# Altium PCB Thunderbolt3.pcbdoc (part 5 of 5)
Units mm, origin at the board's own origin, x right, y up, seen from the top; angles counter-clockwise.
Board outline 43.92 x 41.77 mm, 6 copper layers (TopLayer, MidLayer1, MidLayer2, MidLayer3, MidLayer4, BottomLayer); 211 components, 193 nets, 1132 pads, 744 vias.
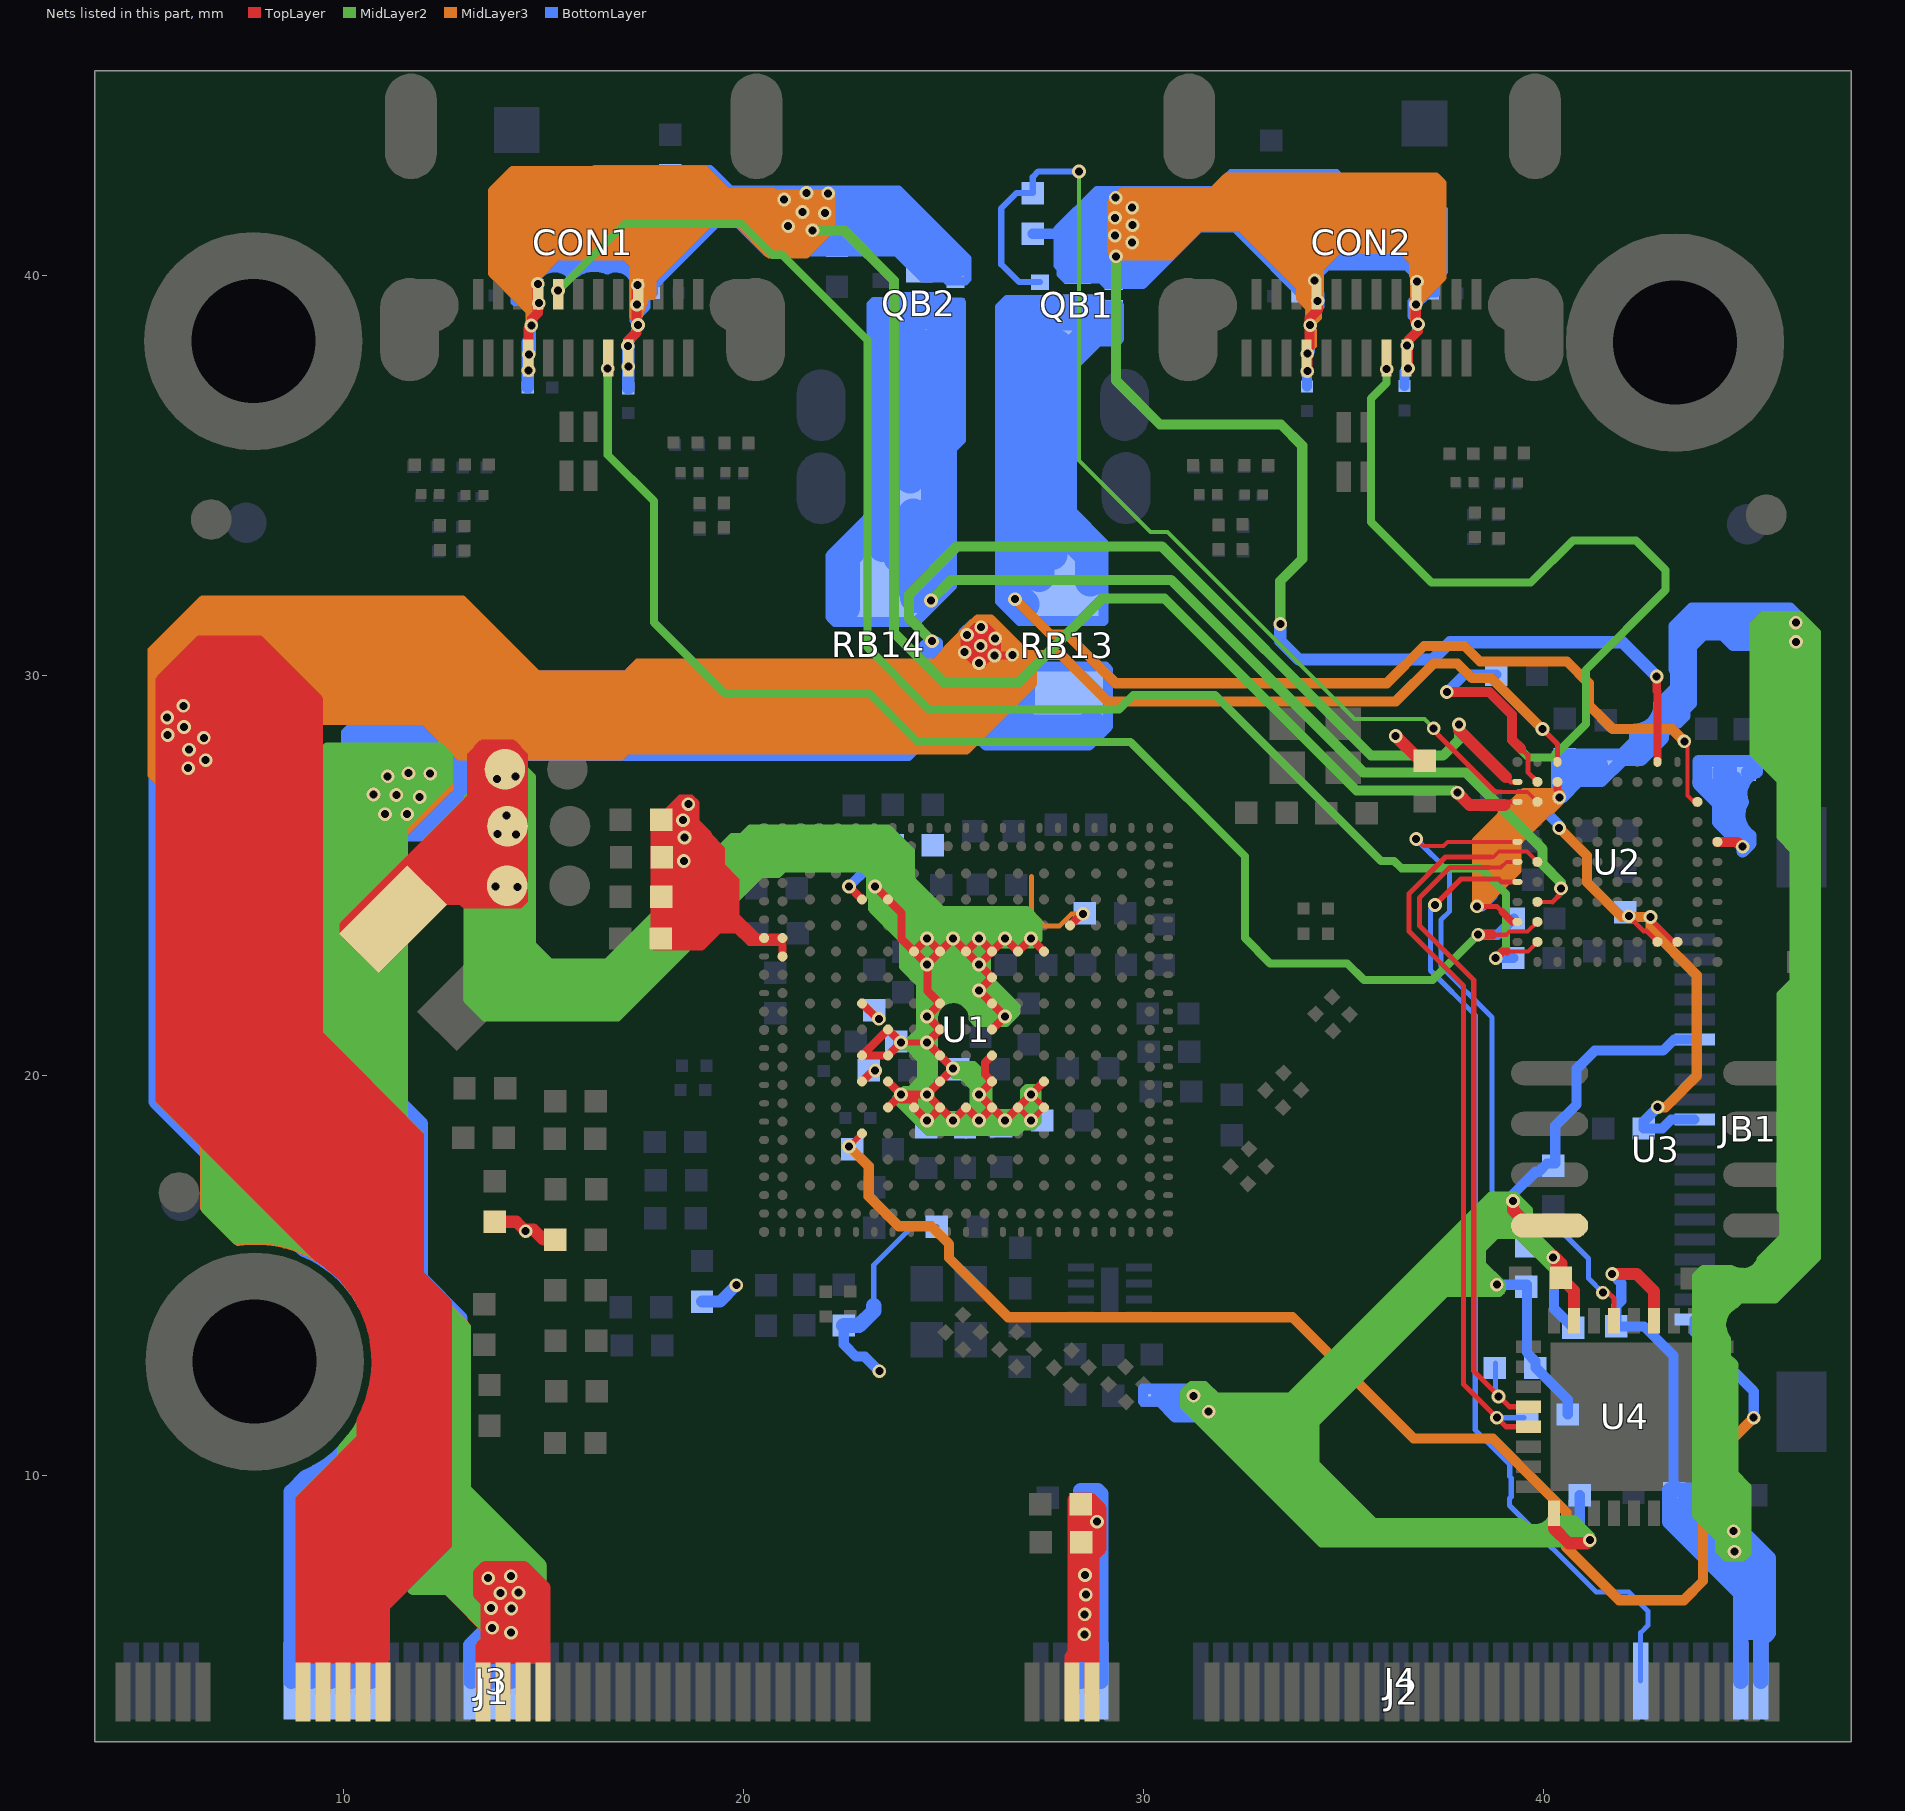
[diagram p9: the nets of this part, all layers, seen from the top]

## Via types
v1: diameter 0.343, hole 0.2, TopLayer to BottomLayer, tented both sides, 632 vias
v2: diameter 0.8, hole 0.8, TopLayer to BottomLayer, 112 vias

## Nets (pads, with @x,y where several pads share a name; then routed paths per layer and width w, separated by ;. In a path a pad name is that pad's centre, name@x,y a point inside that pad or via, vN(x,y) a via of type N, cw(c..) or ccw(c..) an arc to the next point about the centre after c; other vN are vias at no path point) (continued)
U2-K2: CB28.2 CON2.A5 U2.K2 | length 27.5
  TopLayer w0.127: 39.435,28.183 39.603,28.015 39.603,27.59 U2.K2@39.843,27.351
  TopLayer w0.254: v1(37.578,29.596) 38.64,29.596 39.208,29.028 39.208,28.41 39.435,28.183
  MidLayer2 w0.203: v1(36.073,37.668) 36.073,37.325 35.681,36.933 35.681,33.848 37.193,32.335 39.676,32.335 40.728,33.388 42.306,33.388 43.043,32.65 43.043,32.143 41.053,30.153 41.053,28.793 40.216,27.955 39.616,27.955 39.193,28.378 39.193,29.04 38.638,29.596 v1(37.578,29.596)
  BottomLayer w0.254: v1(37.578,29.596) 38.012,30.03 CB28.2@38.816,30.03
U2-K3: QB1.3 RB1.1 U2.K3 | length 27.2
  TopLayer w0.102: 38.833,27.098 39.596,27.098 U2.K3@39.843,26.851
  TopLayer w0.127: v1@37.34,28.548 38.79,27.098 38.833,27.098
  MidLayer2 w0.102: v1@28.386,42.608 28.386,35.385 30.173,33.598 30.593,33.598 35.273,28.918 37.018,28.918 v1(37.248,28.688)
  BottomLayer w0.152: QB1.3@27.408,39.843 26.883,39.843 26.438,40.288 26.438,41.688 26.818,42.068 RB1.1@27.225,42.068 27.225,42.47 27.366,42.611 v1(28.383,42.611)
U2-K6: RB33.1 U2.K6 U4.29 | length 19.6
  TopLayer w0.102: 38.42,25.47 38.748,25.47 38.885,25.608 39.586,25.608 U2.K6@39.843,25.351
  TopLayer w0.127: 38.665,25.47 37.548,25.47 36.633,24.555 36.633,23.613 37.995,22.25 37.995,12.288 39.055,11.228 U4.29@39.62,11.228
  BottomLayer w0.127: v1(38.828,11.453) RB33.1@39.505,11.453
U2-K9: CB36.2 CON1.A5 U2.K9 | length 35.5
  TopLayer w0.102: 38.72,23.528 39.068,23.528 39.145,23.605 39.597,23.605 U2.K9@39.843,23.851
  TopLayer w0.229: v1(38.36,23.528) 38.72,23.528
  MidLayer2 w0.203: v1(16.6,37.686) 16.6,35.526 17.756,34.37 17.756,31.333 19.521,29.568 23.131,29.568 24.351,28.348 29.673,28.348 32.531,25.49 32.531,23.443 33.161,22.813 35.088,22.813 35.508,22.393 37.225,22.393 v1(38.36,23.528)
  BottomLayer w0.254: v1(38.36,23.528) 38.848,23.528 CB36.2@39.255,23.935
U2-K10: CB37.2 CON1.B5 U2.K10 | length 39.9
  TopLayer w0.102: v1(38.798,22.943) 38.967,23.113 39.605,23.113 U2.K10@39.843,23.351
  TopLayer w0.203: v1(38.798,22.943) 38.967,23.113 39.095,23.113
  MidLayer2 w0.203: v1(15.358,39.628) 17.032,41.303 19.946,41.303 20.721,40.528 20.953,40.528 23.091,38.39 23.091,30.708 24.636,29.163 29.381,29.163 29.738,29.52 31.786,29.52 35.931,25.375 36.258,25.375 36.443,25.19 38.416,25.19 39.053,24.553 39.053,23.199 v1(38.798,22.943)
  BottomLayer w0.254: v1(38.798,22.943) CB37.2@39.238,22.943
U2-L5: RB32.2 U2.L5 U4.21 | length 17.9
  TopLayer w0.102: v1(36.81,25.921) 36.988,25.743 37.493,25.743 37.601,25.851 U2.L5@39.343,25.851
  TopLayer w0.127: v1(41.478,14.581) 41.615,14.581 41.755,14.44 U4.21@41.755,13.876
  BottomLayer w0.127: v1(36.81,25.921) 37.648,25.083 37.648,24.115 37.428,23.895 37.428,22.74 38.711,21.458 38.711,16.628 39.526,15.813 39.603,15.813 39.848,16.058 40.493,16.058 41.118,15.433 41.118,14.94 v1(41.478,14.581)
U2-L6: RB34.1 U2.L6 U4.28 | length 17.8
  TopLayer w0.102: 38.645,25.21 38.925,25.21 39.066,25.351 U2.L6@39.343,25.351
  TopLayer w0.127: 38.645,25.21 37.653,25.21 36.893,24.45 36.893,23.753 38.25,22.395 38.25,12.62 39.142,11.728 U4.28@39.62,11.728
  BottomLayer w0.127: RB34.1@38.791,12.82 38.791,12.063 v1(38.87,11.983)
U2-L7: J4.14 U2.L7 | length 24.7
  TopLayer w0.127: v1(37.28,24.273) 37.93,24.923 38.875,24.923 38.947,24.851 U2.L7@39.343,24.851
  BottomLayer w0.127: v1(37.28,24.273) 37.168,24.161 37.168,22.633 38.288,21.513 38.288,11.145 39.152,10.282 39.152,9.979 39.188,9.943 39.188,9.478 39.146,9.435 39.146,9.26 41.311,7.095 42.128,7.095 42.608,6.615 42.608,6.263 42.425,6.08 J4.14@42.425,4.868
VC1: CB2.2 CB9.1 CB10.2 CB11.2 CB12.2 CON1.A4 CON1.A9 CON1.B4 CON1.B9 DB2.2 QB2.4 QB2.7 RB2.1 U2.L3 | length 180.4
  TopLayer w0.127: 38.966,26.851 U2.L3@39.343,26.851
  TopLayer w0.254: v1(14.618,37.638) 14.618,38.686 14.715,38.783 14.715,38.933 14.853,39.07 v1(14.853,39.798) ; v1(17.115,37.736) 17.115,38.38 17.323,38.588 17.323,38.808 17.323,39.741 v1(17.35,39.768)
  TopLayer w0.305: v1(37.843,27.078) 38.153,26.768 39.023,26.768
  MidLayer2 w0.254: v1(21.718,41.138) 22.503,41.138 23.758,39.883 23.758,31.078 25.008,29.828 26.861,29.828 28.966,31.933 30.521,31.933 35.321,27.133 37.788,27.133 v1(37.843,27.078)
  MidLayer3 w0.102: v1(17.103,38.246) v1(17.358,38.773)
  MidLayer3 w0.203: v1(14.618,37.638) 14.618,38.028 v1(14.628,38.038) 14.646,38.056 14.646,39.115 ; v1(17.115,37.736) v1@17.115,38.233 ; 17.55,39.503 17.723,39.503 17.723,39.9 19.138,41.315 19.866,41.315 20.646,40.535 21.563,40.535 22.196,41.168 22.196,42.063 20.775,42.063 20.743,42.095 19.596,42.095 19.046,42.645 14.221,42.645 13.706,42.13 13.706,40.055 14.646,39.115 ; 17.581,39.588 17.333,38.89 17.246,38.978 17.246,40.273 17.033,40.485 15.338,40.485 14.853,40 14.853,39.293 14.675,39.115 14.646,39.115
  MidLayer3 w0.533: 13.988,41.998 13.988,40.095 14.623,39.46 ; 14.148,42.155 14.378,42.385 18.996,42.385 19.561,41.82 21.863,41.82 21.863,41.543 21.863,41.225 21.378,40.74 20.873,40.74 20.046,41.568 19.118,41.568 17.473,39.923 v1@17.473,39.69 ; 14.316,40.35 14.316,41.868 18.941,41.868 ; 14.351,40.378 14.963,40.99 17.598,40.99 ; 14.421,41.065 14.421,41.439 18.457,41.439 ; 14.498,41.143 17.923,41.143 ; 14.568,39.865 14.568,40.138 15.113,40.683 17.181,40.683 17.441,40.423 18.743,41.725 19.476,41.725 ; 20.471,41.405 21.533,41.405 ; 20.638,41.26 21.283,41.26
  BottomLayer w0.203: 14.683,39.053 14.683,39.08 14.416,39.348 14.268,39.348 14.268,39.685 13.708,40.245 13.708,41.32 13.758,41.37 14.976,41.37 16.276,42.67 19.161,42.67 19.673,42.158 23.876,42.158 25.593,40.44 25.593,39.92 25.538,39.865 25.098,39.865 25.023,39.94 24.468,39.94 23.823,40.585 20.563,40.585 19.856,41.293 19.303,41.293 17.758,39.747 CB9.1@17.758,39.57 ; 14.683,39.29 14.863,39.47 14.863,39.988 cw(c15.279,39.651) 15.656,40.03 15.773,40.03 cw(c16.266,39.411) 16.586,40.135 cw(c16.801,39.693) 17.248,39.898 17.248,38.883 v1(17.358,38.773) ; v1@17.115,38.233 v1(17.358,38.773) ; v1@17.358,38.908 17.358,39.01 17.566,39.218 17.566,39.52 ; v1@17.423,39.208 17.358,39.142 v1(17.358,38.773)
  BottomLayer w0.254: v1(14.628,38.038) 14.683,38.094 14.683,40.095
  BottomLayer w0.305: CB11.2@14.6,37.21 14.6,38.342 ; CB10.2@17.115,37.185 v1@17.115,38.233
  BottomLayer w0.457: DB2.2@13.951,40.34 14.548,39.743 14.548,39.553 ; 14.451,40.11 14.678,40.338 15.568,40.338 15.658,40.248 ; DB2.2@14.638,40.763 16.903,40.763 ; DB2.2@14.641,41.108 15.066,41.108 16.418,42.46 19.088,42.46 19.688,41.86 23.853,41.86 25.356,40.358 25.356,40.225 ; 14.821,40.175 DB2.2@14.821,40.433 ; 15.871,40.4 16.523,40.405 17.236,40.245 v1@17.461,39.793 ; 17.393,39.46 17.411,39.48 ; 17.648,39.913 19.261,41.525 20.021,41.525 20.703,40.843 23.923,40.843 24.581,40.185 25.356,40.185
  BottomLayer w1.016: 20.496,41.465 23.583,41.465 24.531,40.518 ; v1@21.608,41.208 21.968,41.208
  BottomLayer w1.27: 15.796,41.088 16.578,41.87 19.181,41.87 ; 16.813,41.253 17.213,41.253 ; 17.571,40.505 18.756,41.69
  other v1: 14.69,38.758 17.333,39.286 14.878,39.318 21.113,41.243 22.028,41.566 21.468,41.596 21.013,41.908 21.568,42.076 22.11,42.063
VC2: CB8.1 CB18.1 QB2.1 QB2.2 QB2.5 QB2.6 QB2.8 RB14.2 U2.K8 | length 67.1
  TopLayer w0.102: U2.K8@39.843,24.351 40.223,24.351
  TopLayer w0.127: 40.223,24.351 40.433,24.56 v1(40.433,24.688)
  MidLayer2 w0.254: v1(24.683,31.883) 25.2,32.4 30.683,32.4 35.503,27.58 38.061,27.58 39.973,25.668 39.973,25.29 40.433,24.831 v1(40.433,24.688)
  BottomLayer w0.254: 22.168,31.468 22.168,33.013 23.193,34.038 23.193,39.28 23.256,39.343 23.713,39.343 23.846,39.475 24.886,39.475 25.028,39.333 25.428,39.333 25.428,35.898 25.208,35.678 25.208,32.25 24.308,31.35 22.286,31.35 22.168,31.468
  BottomLayer w0.762: RB14.2@22.531,31.703 22.531,33.01 23.523,34.003 23.523,38.975 QB2.8@23.956,38.975 ; RB14.2@23.481,33.225 RB14.2@23.553,33.225 ; RB14.2@23.871,32.948 23.871,33.595 ; QB2.8@24.091,39.038 24.968,39.038 24.968,35.8 24.818,35.65 24.818,32.485 RB14.2@24.291,31.958 ; CB18.1@24.163,34.94 QB2.8@24.163,38.458 ; RB14.2@24.236,32.155 CB18.1@24.236,34.048 ; CB18.1@24.448,35.123 24.448,38.273
VC3: J1.33 J1.35 J1.37 J1.39 J3.36 J3.38 J3.40 RB14.1 U2.L2 | length 499.8
  TopLayer w0.127: 39.058,27.463 39.17,27.351 U2.L2@39.343,27.351
  TopLayer w0.305: v1(37.883,28.783) 37.883,28.643 39.058,27.468
  TopLayer w0.381: J1.39@13.48,4.598 13.48,5.733 13.615,5.868 13.615,6.86 13.425,7.05 13.425,7.558 13.553,7.685 14.495,7.685 14.98,7.2 J1.33@14.98,4.598 ; 13.48,5.475 13.493,5.488 14.893,5.488 ; 13.733,5.81 14.59,5.81 ; J1.37@13.98,4.598 13.98,6.36 ; v1@14.068,6.195 v1@14.068,7.123 ; v1@14.125,5.92 13.753,6.293 13.753,7.32 14.52,7.32 14.74,7.1 14.74,5.753 ; v1@14.205,5.97 14.205,7.203 ; 14.378,6.293 14.378,7.395 ; J1.35@14.48,4.598 14.48,6.22
  MidLayer2 w0.254: v1(24.708,30.866) 24.136,31.438 24.136,32.033 25.341,33.238 30.451,33.238 35.681,28.008 37.486,28.008 37.883,28.405 v1(37.883,28.783) ; 6.563,16.66 6.563,25.175 9.591,28.203 12.408,28.203 12.601,28.01 12.601,27.363 11.468,26.23 11.468,16.838 11.791,16.515 11.791,14.985 13.053,13.723 13.053,9.675 14.941,7.788 14.941,6.17 14.726,5.955 13.816,5.955 12.628,7.143 11.733,7.143 9.988,8.888 9.988,10.71 ccw(c7.764,12.857) 7.308,15.915 6.563,16.66
  MidLayer2 w0.66: 7.413,16.258 6.921,16.75 6.921,25.103 9.766,27.948 12.238,27.948 12.238,27.515 11.203,26.48 11.203,16.565 11.438,16.33 11.438,14.853 12.693,13.598 12.693,9.535 14.676,7.553 14.676,6.338 14.336,6.338 ; 7.566,16.293 8.408,16.265 9.558,15.793 ; 9.823,15.743 10.481,15.075 10.973,14.208 11.116,12.463 11.018,11.71 10.348,10.63 10.348,8.96 11.883,7.425 12.893,7.425 14.051,6.268 ; 10.933,11.158 10.933,9.163 12.168,7.928 13.098,7.928 14.416,6.61 ; 11.373,14.303 11.373,9.548 12.616,8.305 ; 11.603,14.443 11.948,14.098 11.948,9.56 ; 12.178,13.52 12.178,9.36 v1@14.206,7.333
  MidLayer2 w1.27: 8.586,17.67 8.586,24.675 10.106,26.195 ; 9.541,17.28 9.541,25.443 ; 10.433,26.665 10.433,16.393 10.893,15.933 ; 11.091,14.94 9.356,16.675 8.041,16.675 7.643,17.073 7.643,25.075 9.913,27.345 11.448,27.345
  MidLayer3 w0.203: 6.511,16.693 6.511,24.983 9.608,28.08 11.816,28.08 12.638,27.258 12.638,27.178 11.501,26.04 11.501,16.868 11.828,16.54 11.828,14.99 13.038,13.78 13.038,9.665 14.971,7.733 14.971,6.155 14.753,5.938 13.758,5.938 12.566,7.13 11.718,7.13 9.938,8.91 9.938,10.665 ccw(c7.782,12.827) 7.353,15.85 6.511,16.693
  MidLayer3 w0.762: 6.893,24.718 6.893,16.753 7.171,16.475 ; 7.008,24.97 9.688,27.65 11.726,27.65 12.166,27.21 11.186,26.23 11.186,16.71 11.466,16.43 11.466,14.793 12.638,13.62 12.638,9.515 14.621,7.533 14.621,6.293 14.231,6.293 ; 7.396,16.258 7.786,16.188 8.858,16.055 9.973,15.513 ; 10.148,15.495 10.903,14.13 11.223,13.455 11.163,12.088 10.853,11.298 10.303,10.518 10.303,9.07 11.926,7.448 12.668,7.448 v1@13.853,6.263 ; 10.928,10.843 10.928,9.223 12.191,7.96 12.916,7.96 v1(14.19,6.686) ; 11.498,12.96 11.498,9.698 12.353,8.843 12.353,8.393 ; 12.021,13.325 12.021,9.405 13.973,7.453
  MidLayer3 w1.27: 7.446,17.438 7.446,24.27 10.298,27.123 v1@10.611,27.123 ; 7.603,16.905 10.048,16.34 ; 8.448,17.11 8.448,24.678 ; 9.263,16.983 9.263,25.49 ; 9.891,25.353 9.891,25.79 ; 11.013,15.02 11.013,15.7 10.481,16.233 10.481,26.395 11.318,27.233 ; 11.191,14.623 11.588,13.663
  BottomLayer w0.254: 10.058,26.415 10.058,28.583 11.823,30.348 13.846,30.348 14.186,30.008 17.071,30.008 17.228,30.165 24.366,30.165 24.488,30.288 24.488,30.743 24.606,30.86 24.823,30.86 24.853,30.83 24.853,28.735 24.121,28.003 13.476,28.003 12.988,27.515 12.988,26.84 12.128,25.98 10.493,25.98 10.058,26.415
  BottomLayer w0.381: J3.40@13.19,4.868 13.19,5.78 13.573,6.163 13.573,6.933 13.341,7.165 13.341,7.573 13.433,7.665 14.353,7.665 14.413,7.605 14.413,6.808 14.19,6.585 J3.36@14.19,4.868 ; 13.427,6.016 13.982,6.016 ; J3.38@13.69,4.868 13.69,6.195 13.991,6.495 ; 13.718,6.863 13.718,7.273 13.718,7.325 v1@14.193,7.325 ; 13.946,6.198 13.946,6.773 14.161,6.988
  BottomLayer w0.508: 10.538,26.258 11.986,26.258 12.663,26.935 12.663,27.565 13.406,28.308 24.056,28.308 24.673,28.925 24.673,30.623
  BottomLayer w0.762: 10.381,26.583 10.381,28.43 11.973,30.023 13.581,30.023 13.928,29.675 ; 14.253,29.58 17.226,29.58 17.406,29.76 24.278,29.76 24.406,29.888
  BottomLayer w1.27: 10.941,26.848 10.941,28.32 11.916,29.295 RB14.1@24.013,29.295 ; v1@11.971,27.075 11.971,27.633 13.318,28.98 RB14.1@22.553,28.98
  other v1: 14.183,6.081 13.713,6.201 13.68,6.696 13.915,7.066 14.37,7.078 13.61,7.443 14.178,7.493 11.03,26.543 11.585,26.543 11.9,26.973 10.743,27.033 11.315,27.023 11.098,27.488 11.62,27.568 12.163,27.556
VC4: CB1.2 CB3.2 CB4.2 CB5.2 CB6.1 CON2.A4 CON2.A9 CON2.B4 CON2.B9 DB1.2 QB1.4 QB1.7 RB1.2 U2.D1 | length 172.7
  TopLayer w0.203: v1(42.825,29.983) 42.825,29.625 42.843,29.608 U2.D1@42.843,27.851
  TopLayer w0.254: v1(34.09,37.616) 34.09,38.173 34.148,38.23 34.148,38.753 34.148,38.94 34.35,39.143 v1(34.35,39.376) ; v1(36.605,37.688) 36.605,38.37 36.855,38.62 v1(36.855,38.793) 36.803,38.845 CON2.B9@36.803,39.425
  MidLayer2 w0.254: v1(29.305,40.488) 29.305,37.388 30.408,36.285 33.433,36.285 33.966,35.753 33.966,32.923 33.415,32.372 v1(33.415,31.296)
  MidLayer3 w0.102: v1@34.106,37.703 34.106,38.071 34.281,38.246 34.281,38.645 v1(34.16,38.766) ; v1@36.603,38.385 36.826,38.608 v1@36.826,38.823
  MidLayer3 w0.203: v1(36.605,37.688) v1@36.605,38.238 ; v1(36.803,39.288) 36.803,39.297 37.468,39.963 37.468,42.325 37.308,42.485 32.086,42.485 31.713,42.113 29.457,42.113 29.196,41.851 29.196,40.598 v1(29.305,40.488) 30.686,40.488 31.423,41.225 32.388,41.225 33.908,39.705 33.908,39.433 34.16,39.181 v1(34.16,38.766) 34.35,38.956 34.35,39.312 34.411,39.373 34.411,40.18 34.883,40.653 36.438,40.653 36.733,40.358 36.733,40.015 36.761,39.988 36.761,38.888 v1(36.855,38.793)
  MidLayer3 w0.483: 29.416,40.66 30.413,40.66 31.193,41.44 32.611,41.44 34.208,39.843 v1@34.208,39.403 ; 29.421,40.895 29.421,41.835 31.776,41.835 32.276,42.335 37.171,42.335 37.171,39.878 36.913,39.62 ; 30.223,41.203 30.673,41.203 ; 30.378,41.025 29.783,41.025 29.783,41.495 31.041,41.495 ; 31.716,41.675 36.771,41.675 ; 32.163,41.888 36.968,41.888 ; 32.951,41.373 36.963,41.373 36.963,41.053 ; 33.131,41.068 36.963,41.068 ; 33.378,40.81 34.516,40.81 ; 33.921,40.49 34.141,40.49 ; 34.221,40.123 34.221,40.355 34.698,40.833 36.703,40.833 36.926,40.61 v1@36.926,39.928
  BottomLayer w0.152: v1(36.585,38.258) v1(36.855,38.793)
  BottomLayer w0.203: 27.846,40.26 27.846,41.168 28.826,42.148 31.766,42.148 32.183,42.565 34.821,42.565 35.728,41.658 37.501,41.658 37.501,40.103 37.306,39.908 37.306,39.56 37.121,39.56 36.776,39.215 36.776,38.913 36.698,38.99 36.698,39.36 36.766,39.428 36.766,40.035 36.568,40.233 34.583,40.233 34.356,40.005 34.356,39.618 34.423,39.55 34.423,39.23 34.223,39.23 32.263,41.19 31.408,41.19 29.986,39.768 29.066,39.768 28.918,39.915 28.048,39.915 27.923,40.04 27.923,40.183 27.846,40.26
  BottomLayer w0.254: RB1.2@27.225,41.053 29.646,41.053 ; CB5.2@34.085,37.235 34.085,38.051 34.16,38.126 34.16,40.066 ; CB4.2@36.518,37.248 36.518,37.601 36.585,37.668 v1(36.585,38.258) ; 36.851,39.523 v1@36.851,39.748
  BottomLayer w0.305: v1(33.415,31.296) 33.415,30.871 33.878,30.408 37.228,30.408 37.661,30.84 41.968,30.84 v1(42.825,29.983)
  BottomLayer w0.508: QB1.7@28.138,40.105 29.051,40.105 29.161,39.995 29.836,39.995 31.238,41.398 32.406,41.398 34.068,39.735 34.068,40.138 34.428,40.498 36.628,40.498 37.016,40.11 37.016,39.695 ; 28.143,40.405 28.143,41.065 29.001,41.923 31.733,41.923 32.146,42.335 34.716,42.335 35.711,41.34 DB1.2@36.553,41.34 ; 37.221,40.153 DB1.2@37.221,40.58
  BottomLayer w0.762: 31.153,41.678 32.783,41.678 34.033,40.428 ; 32.351,41.963 34.418,41.963 35.421,40.96 DB1.2@36.603,40.96 ; 33.631,41.608 34.456,40.783 35.328,40.783 ; 33.769,41.469 34.612,41.469 35.098,40.983
  BottomLayer w1.27: 28.661,41.053 29.076,41.053 ; 28.781,40.555 29.698,40.555 30.526,41.383 ; v1@29.213,41.4 29.846,41.4
  other v1: 34.09,38.056 36.83,39.856 34.275,39.883 29.713,40.833 29.278,41.006 29.718,41.268 29.283,41.451 29.713,41.703 29.3,41.956
VC5: CB7.2 CB17.2 QB1.1 QB1.2 QB1.5 QB1.6 QB1.8 RB13.2 U2.B3 | length 72.3
  TopLayer w0.102: v1@43.598,28.348 43.598,27.008 43.755,26.851 U2.B3@43.843,26.851
  MidLayer3 w0.254: v1(26.783,31.918) 27.668,31.033 28.081,31.033 29.298,29.815 36.078,29.815 37.008,30.745 38.021,30.745 38.406,30.36 40.581,30.36 41.126,29.815 41.126,29.27 41.728,28.668 43.213,28.668 v1(43.516,28.365)
  BottomLayer w0.102: 26.908,32.278 RB13.2@27.221,32.278 ; 26.956,38.595 QB1.1@27.568,38.595
  BottomLayer w0.254: 26.408,31.863 26.408,39.223 26.581,39.395 28.878,39.395 29.016,39.258 29.383,39.258 29.383,38.418 29.328,38.363 28.861,38.363 28.211,37.713 28.211,34.105 28.996,33.32 28.996,31.375 26.896,31.375 26.408,31.863
  BottomLayer w0.762: 27.013,31.79 26.696,32.108 26.696,39.013 28.861,39.013 29.038,38.835 QB1.6@29.038,38.72 ; RB13.2@27.391,32.483 27.391,38.453 QB1.1@27.508,38.453 ; RB13.2@27.711,33.028 27.711,33.29 27.711,38.268 27.848,38.268 ; RB13.2@28.661,32.368 28.661,33.023 27.883,33.8 27.883,37.76 QB1.8@28.678,38.555
VC6: J1.49 J1.51 J1.53 J1.55 J1.57 J3.50 J3.52 J3.54 J3.56 J3.58 RB13.1 U2.J1 | length 532.2
  TopLayer w0.127: v1(39.968,28.671) 40.343,28.296 U2.J1@40.343,27.851
  TopLayer w0.203: v1@26.33,30.608 26.33,30.953 26.067,31.216 v1(25.935,31.216) 25.788,31.216 25.525,30.953 25.525,30.583 25.792,30.316 v1(25.88,30.316) 25.976,30.316 26.168,30.508 26.697,30.508 v1(26.715,30.526)
  TopLayer w0.254: J1.57@8.98,4.598 8.923,4.655 8.923,9.423 10.443,10.943 10.443,11.388 ccw(c7.754,12.858) 9.348,15.475 5.42,19.403 5.42,29.9 6.398,30.878 7.893,30.878 9.36,29.41 9.36,21.025 11.878,18.508 11.878,15.04 12.58,14.338 12.58,8.273 11.033,6.725 11.033,5.44 9.018,5.44 J1.57@9.018,4.943
  TopLayer w0.356: 25.858,30.49 25.728,30.62 25.728,30.958 25.828,31.058 25.92,31.058 26.07,30.908 26.07,30.74 26.04,30.71 26.04,30.7 26.103,30.638 v1@26.185,30.638
  TopLayer w0.381: 9.153,5.668 10.778,5.668 10.778,6.818 ; J1.55@9.48,4.598 9.48,6.113 ; J1.53@9.98,4.598 9.98,6.348 ; J1.51@10.48,4.598 10.48,6.323
  TopLayer w0.584: 9.213,5.96 9.213,9.3 10.788,10.875 10.788,11.328 11.045,12.088 11.078,12.778 10.915,14.223 10.455,15.115 9.938,15.483 ; 9.488,6.105 10.48,6.105 ; 9.708,15.658 9.185,16.18 5.74,19.625 5.74,29.738 6.56,30.558 7.86,30.558 9.063,29.355 9.063,20.795 11.56,18.298 11.56,14.915 12.253,14.223 12.253,8.303 10.563,6.613 ; 10.305,14.948 10.316,15.215
  TopLayer w1.27: 7.263,28.803 7.263,20.188 10.21,17.24 ; 9.913,6.458 9.913,9.44 11.473,11 11.473,14.303 11.078,14.698 ; 10.368,7.093 11.563,8.288 11.563,10.583 ; 10.41,15.715 6.383,19.743 6.383,29.603 6.578,29.798 7.52,29.798 8.37,28.948 8.37,20.465 10.98,17.855 10.98,15.355 ; 10.915,8.108 10.915,9.443
  MidLayer3 w0.203: 5.201,27.525 5.201,30.643 6.471,31.913 12.976,31.913 14.851,30.038 17.056,30.038 17.346,30.328 24.763,30.328 25.071,30.635 25.071,30.658 25.846,31.433 26.181,31.433 27.228,30.385 27.228,29.793 25.571,28.135 17.081,28.135 16.928,27.983 12.888,27.983 11.998,28.873 8.093,28.873 6.371,27.15 5.576,27.15 5.201,27.525
  MidLayer3 w0.254: v1@26.275,30.518 27.948,30.518 29.103,29.363 36.301,29.363 37.243,30.305 37.846,30.305 38.208,29.943 38.696,29.943 v1(39.968,28.671)
  MidLayer3 w0.762: 5.518,27.7 5.518,30.493 6.576,31.55 12.866,31.55 14.768,29.648 17.123,29.648 17.331,29.855 24.853,29.855 26.036,31.038 26.848,30.225 26.848,30.065 25.233,28.45 16.853,28.45 ; 5.666,27.48 6.251,27.48 8.028,29.258 12.066,29.258 12.896,28.428 16.673,28.428 ; 5.981,27.895 5.981,30.05 6.706,30.775 ; 6.306,28.2 7.881,29.775 11.886,29.775 12.719,28.941 14.794,28.941 ; v1@6.483,28.378 6.483,29.66 7.141,30.318 12.853,30.318 13.571,29.6 ; 6.731,29.343 7.803,30.415 ; 6.798,31.005 12.731,31.005 14.878,28.858 24.663,28.858 26.138,30.333 ; 11.228,30.173 12.246,30.173 12.998,29.42 ; 13.103,29.3 17.236,29.3 ; 17.423,29.34 24.768,29.34
  BottomLayer w0.254: 25.498,28.82 25.498,31.09 25.706,31.298 26.118,31.298 27.186,30.23 29.038,30.23 29.106,30.163 29.106,28.73 28.631,28.255 26.063,28.255 25.498,28.82
  BottomLayer w0.381: J3.58@8.69,4.868 8.69,9.6 9.058,9.968 ccw(c7.82,12.806) 8.993,15.673 5.306,19.36 5.306,29.485 5.771,29.95 7.831,29.95 8.756,29.025 8.756,21.968 11.921,18.803 11.921,14.543 ; 8.69,6.015 10.69,6.015 ; J3.56@9.19,4.868 9.19,6.813 ; J3.54@9.69,4.868 9.69,6.768 ; J3.52@10.19,4.868 10.19,6.695 ; 10.391,8.11 10.671,8.11 12.911,10.35 12.911,13.94 11.931,14.92 ; J3.50@10.69,4.868 10.69,9.03
  BottomLayer w0.762: 25.856,30.92 25.856,28.995 26.201,28.65 28.573,28.65 RB13.1@28.686,28.763 ; v1@26.078,30.733 26.901,29.91 26.901,29.22 ; 26.413,30.018 26.413,29.208 26.433,29.188
  BottomLayer w1.27: 5.836,28.948 5.836,19.908 9.501,16.243 ; v1@6.093,29.325 7.431,29.325 8.211,28.545 8.211,21.588 11.208,18.59 11.208,14.693 12.428,13.473 12.428,10.518 10.19,8.28 10.19,6.51 ; 6.508,20.485 6.993,20.485 ; 6.648,28.68 6.648,21.77 10.266,18.153 10.266,16.705 ; 7.343,28.578 7.343,19.598 9.391,17.55 ; 9.19,6.69 9.19,8.247 11.533,10.59 11.533,12.468 11.361,12.64 11.361,14.03 ; 9.266,9.26 9.426,9.26 9.948,9.783 10.146,9.783 10.943,10.58 10.943,11.078 ; 10.033,15.815 10.221,15.815 ; 10.438,16.115 10.636,15.918 10.636,15.165 ; 10.921,14.66 10.988,14.66
  other v1: 6.11,27.693 6.55,27.893 6.13,28.153 6.503,28.451 5.598,28.521 6.008,28.721 5.585,28.958 5.99,29.251 26.268,30.511 25.523,30.591 25.925,30.751 26.288,30.936 25.58,31.026
VC7: CB26.1 CB27.1 CB38.2 CB68.1 CB74.1 CB75.2 J4.2 J4.4 U2.J2 U2.L9 U4.19 | length 181.3
  TopLayer w0.127: v1(38.333,24.238) 38.827,24.238 38.963,24.103
  TopLayer w0.178: 38.963,24.103 39.215,23.851 U2.L9@39.343,23.851
  TopLayer w0.203: 40.343,27.175 U2.J2@40.343,27.351
  TopLayer w0.305: v1(41.713,15.046) 42.325,15.046 42.755,14.615 U4.19@42.755,13.876
  MidLayer2 w0.254: 43.836,9.02 43.836,14.988 43.998,15.15 44.683,15.15 ccw(c44.969,15.576) 45.456,15.415 46.023,15.983 46.023,16.6 45.953,16.67 45.953,22.035 46.273,22.355 46.273,25.653 45.943,25.983 45.943,27.39 45.273,28.06 45.273,31.268 45.501,31.495 46.391,31.495 46.808,31.078 46.808,15.465 45.776,14.433 44.908,14.433 44.783,14.308 ccw(c45.011,13.778) 44.556,13.425 44.556,12.973 44.748,12.78 44.748,10.038 45.063,9.723 45.063,8.085 44.961,7.983 44.576,7.983 44.416,8.143 44.416,8.44 43.836,9.02
  MidLayer2 w0.61: 44.146,12.6 44.146,9.318 44.651,8.813 ; 44.146,12.893 44.443,12.595 44.443,9.853 44.753,9.543 v1@44.753,8.263 ; 44.201,13.13 44.201,14.853 44.568,14.853 ; 44.513,14.463 44.868,14.818 45.663,14.818 46.383,15.538 ; 45.698,15.145 46.313,15.76 46.313,16.873 ; 46.156,28.248 v1@46.156,30.778 ; 46.203,17.038 46.203,21.98 ; 46.253,26.208 46.253,27.523 45.563,28.213 45.563,31.045 45.681,31.163 46.238,31.163 46.466,30.935 46.466,15.75
  MidLayer3 w0.254: v1(38.333,24.238) 38.333,25.885 39.513,27.065 40.39,27.065 40.39,26.87 40.183,26.663 40.086,26.663 40.086,26.628 39.313,25.855 39.313,25.138 v1@38.436,24.26
  MidLayer3 w0.457: 38.533,24.678 38.533,25.75 39.656,26.873 40.033,26.873 38.881,25.72 38.881,24.998 ; 38.733,24.808 38.733,25.413 ; 39.113,25.22 39.113,25.735
  BottomLayer w0.254: v1(38.333,24.238) 38.461,24.238 38.718,24.495 CB38.2@38.718,24.906 ; v1(41.713,15.046) 41.941,14.818 41.941,14.373 41.813,14.245 41.813,13.733 42.511,13.733 43.248,12.995 43.248,9.818 CB75.2@43.421,9.645
  BottomLayer w0.305: 40.516,27.248 40.516,27.783 CB26.1@41.451,27.783 ; 40.666,27.45 40.666,27.533 40.761,27.533 40.761,27.595 41.391,27.595 ; 42.238,28.03 42.893,28.685 ; 42.456,28.465 42.488,28.465 ; 43.001,28.808 43.426,29.233 43.426,29.413 ; 43.066,29.103 43.458,29.495 43.458,31.098 43.916,31.555 46.241,31.555 46.241,30.998 44.836,30.998 44.572,31.261 43.882,31.261 43.596,30.975 ; 44.511,31.383 46.241,31.383 46.241,31.228 44.723,31.228 ; v1@40.333,27.015 v1(40.39,26.958) 40.459,26.958 40.878,27.378 41.448,27.378 41.968,27.898 42.433,27.898 42.983,28.448 42.983,28.573 43.251,28.84 43.361,28.84 43.516,28.995 43.516,29.145 43.676,29.305 43.676,30.713 44.001,31.038 44.473,31.038 44.741,30.77 46.227,30.77 46.363,30.906 46.363,31.475 46.158,31.68 43.706,31.68 43.268,31.243 43.268,30.155 43.311,30.113 43.311,29.703 42.891,29.283 cw(c42.29,29.262) 42.283,28.66 42.283,28.368 41.946,28.03 40.333,28.03 v1@40.333,27.015
  BottomLayer w0.381: CB75.2@43.481,9.32 43.481,8.783 44.756,7.508 ; 43.636,9.413 43.636,9.198 45.048,7.785 45.048,7.29 ; 43.691,8.873 45.096,7.468 ; 43.983,9.56 43.983,9.135 45.248,7.87 45.248,6.303 ; 44.161,9.173 CB74.1@44.161,9.443 ; J4.4@44.925,4.868 44.925,7.076 43.146,8.855 43.146,9.645 44.366,9.645 44.366,9.188 45.616,7.938 45.616,6.07 45.425,5.88 J4.2@45.425,4.868 ; 44.925,6.09 45.453,6.09
  other v1: 44.768,8.103 44.75,8.618 46.308,30.851 46.303,31.331
VC8: C11.2 C15.2 C16.2 C17.2 C36.2 C38.2 C39.2 C201.2 C209.2 C211.2 CB23.1 CB24.1 CB41.2 CB69.1 CB76.2 CB77.2 J2.69 J2.71 J4.68 J4.70 JB1.15 LB1.1 R9.1 R13.1 R17.1 R200.2 RB17.1 RB18.2 RB26.1 RB29.1 RB32.1 RB33.2 RB34.2 U1.E6 U1.F18 U1.G1 U1.G2 U1.H2 U1.L6 U1.R6 U2.A5 U3.8 U4.1 U4.23 | length 203.3
  TopLayer w0.203: 19.138,23.838 19.785,23.838 20.183,23.44 ; U1.H2@20.969,22.987 20.969,23.455 20.333,23.455 19.788,24 19.788,24.888 19.43,25.245 19.43,25.665 19.103,25.993 19.103,26.038 18.79,26.35 18.79,26.823 18.685,26.928 18.42,26.928 17.768,26.275 17.768,23.23 18.945,23.23 19.375,23.66 19.835,23.66 20.143,23.353 U1.G2@20.969,23.353 ; v1@22.59,24.778 U1.E6@22.958,24.41 ; U1.R6@22.958,19.86 v1@23.233,20.135 ; U1.L6@22.958,21.81 v1@23.34,21.428 ; U1.F18@28.158,23.76 v1@28.448,24.05
  TopLayer w0.254: U2.A5@44.343,25.851 44.853,25.851 v1(44.973,25.731)
  TopLayer w0.305: R13.1@13.775,16.351 14.315,16.351 14.513,16.153 14.748,16.153 14.995,15.906 R17.1@15.29,15.906 ; v1(36.298,28.498) R9.1@36.896,27.9 ; v1(39.23,16.873) 39.23,16.645 39.617,16.258 U3.8@40.148,16.258 ; U4.1@40.255,9.068 40.255,8.685 40.625,8.315 41.075,8.315 v1(41.153,8.393) ; C36.2@40.32,15.168 40.32,15.428 40.26,15.488 40.443,15.305 40.443,14.94 40.755,14.628 U4.23@40.755,13.876
  TopLayer w0.381: J2.71@28.208,4.598 28.208,5.473 28.285,5.55 28.285,9.388 28.668,9.388 28.88,9.175 28.88,8.185 28.708,8.013 J2.69@28.708,4.598 ; 28.295,5.54 28.708,5.54 ; 28.428,8.883 C38.2@28.428,9.293 ; 28.468,5.69 28.468,9.165 C38.2@28.533,9.23 ; C39.2@28.673,8.25 C38.2@28.673,9.108
  TopLayer w0.432: C17.2@17.925,23.433 17.925,26.178 v1@18.525,26.778 ; C17.2@17.995,23.4 18.72,23.4 19.278,23.958 19.278,24.408 18.808,24.878 18.808,25.67 18.246,26.233 ; 18.263,26.213 18.263,23.735 18.945,23.735 18.945,24.248 ; 18.595,23.86 18.595,25.545 ; v1(18.615,26.793) 18.615,26.133 19.14,25.608 19.14,25.118 19.573,24.685 19.573,23.983 ; 18.853,24.325 18.853,24.791
  MidLayer2 w0.254: 31.041,11.75 34.453,8.338 41.097,8.338 v1(41.153,8.393) 41.153,8.498 40.771,8.88 40.196,8.88 cw(c39.775,9.189) 39.406,8.82 35.758,8.82 34.271,10.308 34.271,11.323 37.543,14.595 38.876,14.595 38.936,14.655 38.936,14.778 38.433,15.28 38.433,15.678 38.801,16.045 39.373,16.045 40.186,15.233 40.278,15.233 40.316,15.27 40.316,15.443 39.601,16.158 39.601,16.64 39.263,16.978 38.691,16.978 33.676,11.963 31.803,11.963 31.521,12.245 31.203,12.245 31.041,12.083 31.041,11.75
  MidLayer2 w0.483: v1@31.303,11.928 34.611,8.62 39.236,8.62 ; 31.491,11.975 34.601,8.865 35.433,8.865 ; 31.906,11.78 33.748,11.78 36.791,14.823 ; 32.233,11.61 34.683,9.16 ; 32.548,11.558 33.313,10.793 33.443,10.793 ; 32.988,11.473 32.988,11.328 33.143,11.173 33.238,11.173 33.421,11.355 33.328,11.355 ; 33.606,10.468 33.606,11.578 ; 35.441,8.88 33.991,10.33 33.991,11.518 37.291,14.818 38.621,14.818 ; 37.021,14.85 38.861,16.69 39.311,16.69 ; 37.598,15.063 37.878,15.063 ; 37.908,15.17 37.908,15.523 ; 38.333,15.058 38.251,15.14 38.251,15.823 38.653,16.225 39.326,16.225 ; 38.723,16.635 38.833,16.525 39.341,16.525 ; 39.453,8.518 39.758,8.518 ; 40.166,8.538 40.818,8.538
  MidLayer3 w0.127: 27.198,24.983 27.198,24.063 27.518,23.743 27.891,23.743 28.198,24.05 v1(28.48,24.05)
  BottomLayer w0.127: 23.251,14.255 23.251,15.27 24.208,16.228 R200.2@24.83,16.228
  BottomLayer w0.152: 44.593,26.85 44.593,27.583
  BottomLayer w0.254: RB17.1@18.503,24.608 v1(18.503,25.371) ; RB26.1@22.5,13.76 22.5,13.288 22.808,12.98 23.026,12.98 v1(23.39,12.616) ; v1(22.633,24.735) 23.088,25.19 23.316,25.19 23.73,25.605 C201.2@23.73,25.766 ; LB1.1@29.983,12.15 29.983,11.858 30.381,11.858 30.783,11.455 31.728,11.455 31.763,11.49 31.763,11.92 31.506,12.178 LB1.1@29.983,12.178 ; LB1.1@30.308,11.998 31.416,11.998 31.658,11.755 30.808,11.755 30.566,11.998 ; 30.868,11.598 v1@31.617,11.598 ; v1(38.828,14.778) 39.581,14.778 39.581,13.08 39.793,12.868 39.793,12.713 40.603,11.903 RB33.2@40.603,11.536 ; v1(39.23,16.873) 39.23,17.032 39.801,17.603 39.876,17.603 40.082,17.809 40.288,17.809 40.288,18.75 40.823,19.285 40.823,20.178 41.276,20.63 42.981,20.63 43.261,20.911 JB1.15@43.773,20.911 ; v1@40.26,15.488 40.26,14.176 CB69.1@40.735,13.701 ; CB76.2@40.903,9.516 40.903,8.643 v1(41.153,8.393)
  BottomLayer w0.305: RB29.1@18.958,14.355 19.405,14.355 v1(19.815,14.766) ; CB24.1@44.066,27.66 44.066,27.378 44.593,26.85 44.593,26.375 44.993,25.975 ; 44.381,27.648 44.381,27.053 44.681,26.753 44.681,27.698 44.628,27.75 ; 44.803,27.313 CB23.1@44.803,27.458 ; v1@44.973,25.605 44.973,25.61 45.168,25.805 45.168,26.008 cw(c45.52,26.528) 44.978,26.845 cw(c45.515,27.048) 45.333,27.593 ; v1(44.973,25.731) 44.361,26.343 44.361,26.8 43.868,27.293 43.868,27.87 45.333,27.87 45.333,27.593 ; CB23.1@45.091,27.593 45.333,27.593
  BottomLayer w0.381: RB26.1@22.5,13.76 22.886,13.76 23.251,14.125 23.251,14.255 ; J4.70@28.425,4.868 28.425,9.628 28.853,9.628 28.925,9.556 J4.68@28.925,4.868 ; v1@28.515,6.013 28.925,6.013 ; 28.683,6.118 CB77.2@28.683,9.195
  other v1: 28.515,6.038 28.523,6.538 28.553,7.028 28.533,7.521 28.833,8.856 31.625,11.606 31.243,12.001 40.236,15.463 14.548,16.118 23.288,20.135 23.378,21.428 18.518,25.961 18.48,26.393
VC9: CB64.1 JB1.1 U1.V6 | length 35.6
  TopLayer w0.152: v1@22.593,18.195 U1.V6@22.958,18.56
  MidLayer3 w0.254: v1(22.633,18.235) 23.126,17.743 23.126,16.988 23.873,16.24 24.691,16.24 25.131,15.8 25.131,15.448 26.613,13.965 33.718,13.965 36.751,10.933 38.728,10.933 40.563,9.098 40.563,8.213 41.886,6.89 43.501,6.89 43.983,7.373 43.983,8.855 44.438,9.31 44.438,10.644 v1(45.25,11.456)
  BottomLayer w0.254: JB1.1@43.773,13.911 43.773,13.591 45.25,12.113 v1(45.25,11.456)
VC10: C9.1 C10.1 C14.1 C202.2 C203.2 C204.2 C205.2 C210.1 C212.2 C213.1 C216.1 CB50.2 CB58.2 CB61.2 L3.1 U1.E8 U1.H9 U1.H11 U1.H12 U1.H13 U1.H15 U1.H16 U1.J13 U1.L11 U1.L13 U1.M8 U1.M11 U1.M13 U1.N6 U1.N8 U1.N11 U1.N13 U1.R8 U1.R11 U1.R13 U1.R16 U1.T8 U1.T9 U1.T11 U1.T12 U1.T13 U1.T15 U1.T16 | length 181.5
  TopLayer w0.152: v1(23.933,20.835) v1(24.583,20.835) ; U1.T15@26.858,19.21 v1(27.183,18.885) ; v1(27.183,19.535) U1.T16@27.508,19.21 v1@27.188,18.89
  TopLayer w0.203: L3.1@9.993,23.57 9.993,23.773 13.18,26.96 13.18,28.013 13.473,28.305 14.215,28.305 14.5,28.02 14.5,24.385 14.398,24.283 13.035,24.283 12.945,24.373 L3.1@11.735,24.373 ; v1(23.283,24.735) 23.943,24.075 23.943,23.425 24.598,22.77 24.598,22.12 U1.L11@24.908,21.81 v1(24.583,21.485) U1.M11@24.908,21.16 v1(24.583,20.835) U1.N11@24.908,20.51 v1(25.233,20.185) v1(24.583,19.535) ; U1.T8@23.608,19.21 v1(23.933,19.535) ; U1.R8@23.608,19.86 v1(23.933,19.535) ; v1@23.928,19.408 24.258,19.408 U1.T9@24.258,19.21 v1(24.583,18.885) ; U1.H9@24.258,23.11 v1(24.583,23.435) U1.H11@24.908,23.11 ; v1(24.583,22.785) v1(25.233,23.435) U1.J13@26.208,22.46 v1(25.883,22.135) v1(26.533,21.485) U1.M13@26.208,21.16 ; v1@24.613,18.885 U1.T11@24.923,19.195 ; U1.H12@25.558,23.11 v1(25.883,23.435) U1.H13@26.208,23.11 ; v1@25.81,18.958 U1.T12@25.558,19.21 v1(25.233,18.885) v1(24.583,19.535) ; v1(25.883,18.885) U1.T13@26.159,19.161 ; v1(25.883,22.785) v1(26.533,23.435) U1.H15@26.858,23.11 v1(27.183,23.435) U1.H16@27.508,23.11 ; U1.N13@26.208,20.51 26.028,20.33 26.028,20.04 U1.R13@26.208,19.86 v1(25.883,19.535) v1(26.533,18.885) U1.R16@27.508,19.86 ; v1(23.933,19.535) v1(24.583,19.535) ; U1.N6@22.958,20.51 U1.M8@23.608,21.16 v1(23.933,20.835) U1.N8@23.608,20.51 U1.N6@22.958,20.51
  TopLayer w0.787: L3.1@10.378,23.643 13.573,26.838 13.573,27.868 14.115,27.868 14.115,24.663 L3.1@11.898,24.663 ; 12.345,25.018 13.553,25.018 13.553,26.315 ; 12.833,25.64 13.355,25.64
  MidLayer2 w0.254: v1@24.013,19.438 24.646,18.805 25.703,18.805 25.703,19.023 ; 24.151,19.475 24.358,19.475 ; 24.328,19.285 24.328,19.62 ; 24.351,20.71 24.451,20.71 ; 24.391,20.85 v1@24.568,20.85 ; 24.436,21.045 24.436,22.315 24.016,22.735 24.016,23.405 23.241,24.18 23.241,24.45 23.186,24.505 23.186,25.025 22.998,25.213 20.993,25.213 20.853,25.073 20.421,25.073 16.838,21.49 13.531,21.49 13.126,21.895 13.126,26.938 13.226,27.038 13.226,27.205 13.708,27.688 14.458,27.688 14.676,27.47 14.676,23.28 15.153,22.803 16.588,22.803 19.728,25.943 19.956,25.943 20.173,26.16 23.598,26.16 24.151,25.608 24.151,24.91 24.946,24.115 27.073,24.115 27.343,23.845 27.343,23.428 27.223,23.308 26.346,23.308 26.051,23.013 26.051,22.473 26.793,21.73 26.793,21.593 26.551,21.35 25.826,21.35 25.743,21.433 25.743,21.615 ; 24.436,21.153 24.436,21.12 24.166,20.85 23.856,20.85 23.856,20.763 24.118,20.763 24.463,20.418 24.463,19.915 24.171,19.623 24.02,19.623 23.833,19.435 23.833,19.408 24.618,18.623 26.823,18.623 26.961,18.76 27.221,18.76 27.318,18.858 27.318,19.6 27.253,19.665 27.081,19.665 27.041,19.625 27.041,19.325 26.758,19.043 26.088,19.043 26.088,19.893 25.738,20.243 25.29,20.243 25.276,20.243 25.276,20.05 25.458,20.05 25.778,19.73 25.778,19.268 25.503,18.993 24.983,18.993 24.646,19.33 24.646,19.945 24.728,20.028 24.728,21.12 ; 24.478,19.693 24.478,19.193 v1@24.733,18.938 ; 24.548,20.148 24.548,21.285 ; v1@24.616,20.923 24.781,21.088 24.781,21.215 cw(c25.243,21.434) 25.743,21.54 ; 25.601,20.098 25.886,19.813 25.886,18.8 26.666,18.8 26.751,18.885 v1(27.183,18.885) ; 26.946,19.055 27.133,19.055 v1@27.133,19.378
  MidLayer2 w0.66: 13.603,21.97 13.518,22.055 13.518,26.983 13.853,27.318 14.333,27.318 14.333,23.1 15.023,22.41 16.646,22.41 19.781,25.545 20.183,25.545 20.391,25.753 23.451,25.753 23.763,25.44 23.763,24.933 24.956,23.74 26.001,23.74 ; 13.741,21.81 16.621,21.81 20.173,25.363 20.806,25.363 20.883,25.44 23.333,25.44 23.583,25.19 23.583,24.195 24.336,23.443 24.336,22.983 24.796,22.523 ; 13.963,26.71 13.963,22.438 14.736,22.438 ; 24.683,21.918 24.683,22.01 24.983,22.31 25.508,22.31 25.968,21.85 25.968,21.695 ; 24.718,23.19 25.478,23.19 ; 24.863,22.78 25.353,22.78 ; 26.381,21.695 25.671,22.405 25.671,23.185 26.183,23.698 26.991,23.698
  other v1: 13.8,24.733 14.343,24.718 13.843,26.041 14.305,26.036 14.073,26.511 13.838,27.418 14.298,27.485
VC11: CB34.2 CB54.1 JB1.11 RB11.1 U2.C10 U2.D10 | length 14.4
  TopLayer w0.127: v1(42.128,23.991) 42.501,23.618 42.576,23.618 U2.D10@42.843,23.351 ; v1@42.67,23.925 43.245,23.351 U2.C10@43.343,23.351
  MidLayer3 w0.254: v1(40.388,26.196) 41.081,25.503 41.081,24.84 41.948,23.973 v1(42.67,23.973) 42.67,23.676 43.828,22.518 43.828,20 43.044,19.216 v1(42.848,19.216)
  BottomLayer w0.254: RB11.1@39.571,26.945 39.706,26.945 40.388,26.263 v1(40.388,26.196) ; v1(42.848,19.216) 42.5,18.868 CB54.1@42.5,18.686 42.964,18.686 43.189,18.911 JB1.11@43.773,18.911
pads on no net: C218.2 J2.5 J2.7 J2.11 J2.13 J2.17 J2.19 J2.23 J2.25 J4.46 J4.48 J4.52 U1.A3 U1.A5 U1.AB7 U1.AB9 U1.AB11 U1.AB13 U1.AB23 U1.AC7 U1.AC9 U1.AC11 U1.AC13 U1.B3 U1.B5 U1.B23 U1.C1 U1.C2 U1.E1 U1.E2 U1.H5 U1.J9 U1.J11 U1.N1 U1.N2 U1.P1 U1.P2 U2.A6 U2.A7 U2.B1 U2.B5 U2.B6 U2.B8 U2.C1 U2.E10 U2.G8 U2.H4 U2.H5 U2.H8 U2.H11 U2.J11 U2.K1 U2.K4 U2.K5 U2.K7 U2.L1 U2.L10 U4.2 U4.3 U4.9 U4.10 U4.11 U4.12 U4.13 U4.22 U4.25 U4.26 U4.27 U4.30 U4.31 U4.32 UB1.0
copper on no net: | length 34.9
  TopLayer w0.076: 25.735,38.368 25.838,38.328
  TopLayer w0.102: 24.67,37.551 25.38,37.551 25.123,37.066 25.123,37.083 24.833,37.083 ; 24.943,37.546 25.29,38.441 ccw(c25.453,37.545) 24.943,36.791 24.943,37.868 ; 24.998,36.516 25.678,37.038 ; 25.196,36.668 ccw(c25.453,37.52) 25.865,38.308 ; 25.422,36.842 25.355,36.976 25.95,37.873 ; 25.838,38.081 25.838,38.56 ; 25.883,38.643 25.443,37.823 25.885,37.823
  TopLayer w0.178: 24.675,37.713 24.845,37.478 24.846,37.71 24.843,37.166 24.848,37.903 ; 24.838,36.353 24.838,36.283 26.073,36.283 ; 24.841,38.022 24.923,38.243 ; 24.855,36.951 24.72,37.248 24.65,37.633 24.738,37.921 25.158,38.336 24.943,37.868 ; 26.273,36.738 26.415,36.738 ; 24.265,35.981 26.703,35.981 26.703,38.858 24.265,38.858 24.265,35.981 ; 25.045,37.168 25.045,37.458 25.235,37.458 25.045,37.168
  TopLayer w0.203: 25.408,36.728 25.735,36.801 26.078,37.028 26.25,37.363 26.253,37.666 26.118,37.966 25.838,38.253 25.838,38.261
  TopLayer w0.254: 25.76,38.188 25.618,37.936 25.893,37.936 25.95,37.873 ; 25.855,37.206 25.958,37.703 25.531,36.925 25.505,36.906 26.01,37.161 26.075,37.748

## Polygon pours and split planes (outlines as drawn)
GND on MidLayer1 "MidLayer1-GND" (hatched 90Degree grid 0.102 track 0.152, remove dead copper, pour order 2): 4.328,40.89 4.328,3.863 45.801,3.863 45.801,8.48 47.131,8.48 47.131,40.88 40.063,40.88 40.063,44.65 11.156,44.65 11.156,40.89
GND on MidLayer2 "MidLayer2-GND" (hatched 90Degree grid 0.102 track 0.152, remove dead copper, pour order 4): 4.338,3.863 45.801,3.863 45.801,8.48 47.131,8.48 47.131,40.88 40.063,40.88 40.063,44.65 11.156,44.65 11.156,40.89 4.328,40.89 4.328,3.863
VC8 on MidLayer3 "MidLayer3-NewNet12" (hatched 90Degree grid 0.051 track 0.102, remove dead copper, pour order 6): 27.511,7.843 28.116,7.238 28.116,6.18 28.391,5.905 28.943,5.905 29.021,5.983 29.021,8.825 29.928,9.733 31.066,9.733 31.953,10.62 31.953,11.7 31.328,12.325 30.783,12.325 30.603,12.145 30.603,11.365 30.323,11.085 26.586,11.085 26.221,11.45 26.221,12.575 23.711,15.085 19.151,15.085 18.611,14.545 17.858,14.545 16.521,15.883 16.521,18.365 17.891,19.735 17.891,22.99 18.658,23.758 18.658,25.633 18.811,25.785 18.811,26.573 19.726,26.573 19.973,26.325 19.973,25.788 20.723,25.038 21.973,25.038 22.498,24.513 22.728,24.513 23.028,24.813 23.283,24.813 23.58,24.515 23.588,24.515 23.588,22.69 22.996,22.098 22.996,20.188 23.173,20.01 23.473,20.01 23.656,20.193 23.656,22.158 24.401,22.903 24.401,23.143 24.841,23.583 24.841,24.825 25.681,25.665 26.633,25.665 26.901,25.398 26.901,24.043 27.381,23.563 27.781,23.563 28.136,23.918 28.663,23.918 28.663,24.3 27.543,24.3 27.281,24.563 27.281,26.715 30.188,26.715 31.038,25.865 34.981,25.865 36.446,27.33 36.913,27.33 37.113,27.53 42.326,27.53 43.678,26.178 43.678,25.76 44.016,25.423 44.981,25.423 45.128,25.57 45.128,25.863 44.893,26.098 44.803,26.098 42.658,28.243 36.896,28.243 36.506,28.633 35.233,28.633 33.743,27.143 32.158,27.143 32.083,27.218 31.671,27.218 30.548,28.34 26.688,28.34 25.816,27.468 18.003,27.468 16.963,26.428 16.963,23.595 16.353,22.985 16.353,19.868 15.131,18.645 15.131,17.3 14.766,16.935 14.463,16.935 14.133,16.605 14.133,15.918 14.333,15.718 14.513,15.718 15.803,14.428 16.413,14.428 16.641,14.2 16.641,13.775 17.448,12.968 19.813,12.968 20.398,13.553 22.476,13.553 23.233,12.795 23.233,10.613 26.003,7.843
GND on MidLayer3 "MidLayer3-GND" (hatched 90Degree grid 0.102 track 0.152, remove dead copper, pour order 8): 4.328,3.863 45.801,3.863 45.801,8.48 47.131,8.48 47.131,40.88 40.063,40.88 40.063,44.65 11.156,44.65 11.156,40.89 4.328,40.89
GND on MidLayer4 "MidLayer4-GND" (hatched 90Degree grid 0.102 track 0.152, remove dead copper, pour order 10): 4.328,3.863 45.801,3.863 45.801,8.48 47.131,8.48 47.131,40.88 40.063,40.88 40.063,44.65 11.156,44.65 11.156,40.89 4.328,40.89
VC10 on BottomLayer "BottomLayer-NewNet24" (hatched 90Degree grid 0.051 track 0.102, remove dead copper, pour order 12): 23.786,25.133 23.461,24.808 23.171,24.808 23.073,24.71 23.073,24.488 23.213,24.348 23.413,24.348 23.623,24.138 23.623,23.613 24.361,23.613 24.361,21.26 24.133,21.033 23.571,21.033 23.571,20.63 24.663,20.63 24.663,19.653 23.773,19.653 23.693,19.573 23.693,18.965 23.988,18.67 24.218,18.67 24.218,18.545 24.316,18.448 24.863,18.448 25.021,18.29 25.183,18.29 25.183,18.463 25.793,18.463 25.926,18.33 26.111,18.33 26.111,18.433 26.848,18.433 27.016,18.6 27.728,18.6 27.728,19.063 27.451,19.34 27.451,19.6 27.293,19.758 26.991,19.758 26.891,19.658 25.648,19.658 25.648,20.423 25.403,20.423 25.403,21.743 26.276,21.743 26.276,21.26 26.803,21.26 26.803,21.995 26.486,22.313 26.486,23.263 27.323,23.263 27.323,23.72 27.038,24.005 27.038,24.01 24.546,24.01 24.196,24.36 24.196,24.97 24.528,25.303 24.986,25.303 24.986,25.973 24.511,25.973 24.261,25.723 24.261,25.288 24.106,25.133

## Keep-outs
KeepOutLayer:
  lines w0.102: 3.825,3.756 ccw(c4.173,3.756) 4.173,3.408 6.625,3.408 ccw(c6.625,3.756) 6.973,3.756 6.973,6.283 cw(c7.51,6.283) 7.51,6.821 7.715,6.821 cw(c7.715,6.283) 8.253,6.283 8.253,3.756 ccw(c8.6,3.756) 8.6,3.408 23.325,3.408 ccw(c23.325,3.756) 23.673,3.756 23.673,6.421 cw(c24.493,6.421) 24.493,7.241 25.843,7.241 cw(c25.843,6.421) 26.663,6.421 26.663,3.756 ccw(c27.01,3.756) 27.01,3.408 29.438,3.408 ccw(c29.438,3.756) 29.785,3.756 29.785,6.283 cw(c30.323,6.283) 30.323,6.821 30.46,6.821 cw(c30.46,6.283) 30.998,6.283 30.998,3.756 ccw(c31.345,3.756) 31.345,3.408 45.953,3.408 ccw(c45.953,3.756) 46.3,3.756 46.3,8.911 47.643,8.911 47.643,41.378 41.36,41.378 cw(c41.36,42.081) 40.658,42.081 40.658,45.078 10.643,45.078 10.643,42.081 cw(c9.94,42.081) 9.94,41.378 3.825,41.378 3.825,3.756

## Other copper
TopLayer:
  text "WWW.ARTPCB.C0.IL" at 23.393,39.283 h0.53

## Silkscreen, mask and mechanical layers (free items; w line width, h text height)
TopOverlay:
  text "H1" at 4.593,40.436 h0.76
  text "H2" at 45.368,40.428 h0.76
  text "B1" at 30.653,40.263 h0.64 r90
  text "B1" at 10.165,39.978 h0.64
  text "B12" at 21.975,38.421 h0.64 r90
  text "A1" at 18.788,36.868 h0.64
  text "A1" at 38.083,36.661 h0.64
  text "A12" at 31.378,36.566 h0.64
  text "A12" at 10.255,36.446 h0.64
  text "1" at 17.72,36.141 h0.64
  text "1" at 37.045,35.998 h0.58
  text "L2" at 34.845,33.421 h0.71
  text "L1" at 15.228,31.808 h0.81
  text "H3" at 6.41,15.971 h0.76
  text "57" at 8.608,7.781 h0.81
  text "67" at 6.765,7.728 h0.81
  text "75" at 25.31,7.716 h0.81
  text "1" at 45.16,7.688 h0.81
  text "1" at 22.435,7.641 h0.81
  text "57" at 31.18,7.603 h0.81
  text "75" at 3.815,7.588 h0.81
  text "67" at 29.148,7.546 h0.81
BottomOverlay:
  lines w0.102: 14.04,39.463 14.04,39.763 ; 14.883,37.173 14.883,37.473 ; 18.073,39.533 18.073,39.833 ; 33.523,39.478 33.523,39.778 ; 33.915,37.088 34.215,37.088 ; 36.353,37.093 36.653,37.093 ; 37.525,39.533 37.525,39.833
  lines w0.203: 15.435,40.983 ccw(c15.513,41.25) 15.498,41.528 ; 35.633,40.546 ccw(c35.729,40.812) 35.683,41.091
  text "2.1" at 7.585,30.053 h0.89 r270
  text "Rev" at 7.613,27.331 h0.74 r270
  text "DP" at 8.935,25.121 h0.74 r270
  text "MODULE" at 7.625,22.348 h0.74 r270
  text "21A-21110" at 10.263,19.576 h0.81 r270
  text "TAMALES" at 8.963,19.548 h0.79 r270
  text "TBT" at 7.595,19.521 h0.74 r270
  text "2" at 46.543,9.241 h0.84
  text "58" at 10.018,8.878 h0.86
  text "2" at 23.085,8.811 h0.84
  text "58" at 32.735,8.823 h0.84
  text "68" at 7.59,8.778 h0.86
  text "74" at 5.123,8.693 h0.89
TopSolder:
  drawing of 196 lines, arcs and shapes, not listed
  text "B" at 26.805,41.181 h0.79
  text "ARP" at 23.738,41.131 h0.86
  text "Route" at 20.768,40.416 h0.46
  text "vour" at 22.773,40.423 h0.51
  text "wzy" at 24.428,40.408 h0.51
  text "to" at 25.81,40.426 h0.51
  text "success" at 26.695,40.416 h0.46
  text "WWW.ARTPCB.C0.IL" at 23.393,39.283 h0.53
  text "nter" at 24.518,33.601 h1.12
BottomSolder:
  lines w0.254: 3.86,3.763 23.545,3.763 ; 3.86,3.858 23.545,3.858 ; 3.86,3.954 23.545,3.954 ; 3.86,4.049 23.545,4.049 ; 3.86,4.144 23.545,4.144 ; 3.86,4.239 23.545,4.239 ; 3.86,4.334 23.545,4.334 ; 3.86,4.429 23.545,4.429 ; 3.86,4.525 23.545,4.525 ; 3.86,4.62 23.545,4.62 ; 3.86,4.715 23.545,4.715 ; 3.86,4.81 23.545,4.81 ; 3.86,4.905 23.545,4.905 ; 3.86,4.938 23.545,4.938 ; 3.86,5 23.545,5 ; 3.86,5.095 23.545,5.095 ; 3.86,5.191 23.545,5.191 ; 3.86,5.286 23.545,5.286 ; 3.86,5.381 23.545,5.381 ; 3.86,5.476 23.545,5.476 ; 3.86,5.571 23.545,5.571 ; 3.86,5.666 23.545,5.666 ; 3.86,5.761 23.545,5.761 ; 3.86,5.857 23.545,5.857 ; 3.86,5.952 23.545,5.952 ; 3.86,6.047 23.545,6.047 ; 3.86,6.142 23.545,6.142 ; 3.86,6.237 23.545,6.237 ; 3.86,6.332 23.545,6.332 ; 3.86,6.427 23.545,6.427 ; 3.86,6.523 23.545,6.523 ; 3.86,6.618 23.545,6.618 ; 3.86,6.713 23.545,6.713 ; 3.86,6.808 23.545,6.808 ; 3.86,6.903 23.545,6.903 ; 3.86,6.998 23.545,6.998 ; 3.86,7.093 23.545,7.093 ; 3.86,7.189 23.545,7.189 ; 3.86,7.284 23.545,7.284 ; 3.86,7.379 23.545,7.379 ; 3.86,7.474 23.545,7.474 ; 3.86,7.569 23.545,7.569 ; 3.86,7.664 23.545,7.664 ; 3.86,7.76 23.545,7.76 ; 3.86,7.855 23.545,7.855 ; 3.86,7.95 23.545,7.95 ; 3.86,8.045 23.545,8.045 ; 3.86,8.14 23.545,8.14 ; 3.86,8.235 23.545,8.235 ; 3.86,8.33 23.545,8.33 ; 3.86,8.426 23.545,8.426 ; 26.798,3.763 46.483,3.763 ; 26.798,3.858 46.483,3.858 ; 26.798,3.954 46.483,3.954 ; 26.798,4.049 46.483,4.049 ; 26.798,4.144 46.483,4.144 ; 26.798,4.239 46.483,4.239 ; 26.798,4.334 46.483,4.334 ; 26.798,4.429 46.483,4.429 ; 26.798,4.525 46.483,4.525 ; 26.798,4.62 46.483,4.62 ; 26.798,4.715 46.483,4.715 ; 26.798,4.81 46.483,4.81 ; 26.798,4.905 46.483,4.905 ; 26.798,4.938 46.483,4.938 ; 26.798,5 46.483,5 ; 26.798,5.095 46.483,5.095 ; 26.798,5.191 46.483,5.191 ; 26.798,5.286 46.483,5.286 ; 26.798,5.381 46.483,5.381 ; 26.798,5.476 46.483,5.476 ; 26.798,5.571 46.483,5.571 ; 26.798,5.666 46.483,5.666 ; 26.798,5.761 46.483,5.761 ; 26.798,5.857 46.483,5.857 ; 26.798,5.952 46.483,5.952 ; 26.798,6.047 46.483,6.047 ; 26.798,6.142 46.483,6.142 ; 26.798,6.237 46.483,6.237 ; 26.798,6.332 46.483,6.332 ; 26.798,6.427 46.483,6.427 ; 26.798,6.523 46.483,6.523 ; 26.798,6.618 46.483,6.618 ; 26.798,6.713 46.483,6.713 ; 26.798,6.808 46.483,6.808 ; 26.798,6.903 46.483,6.903 ; 26.798,6.998 46.483,6.998 ; 26.798,7.093 46.483,7.093 ; 26.798,7.189 46.483,7.189 ; 26.798,7.284 46.483,7.284 ; 26.798,7.379 46.483,7.379 ; 26.798,7.474 46.483,7.474 ; 26.798,7.569 46.483,7.569 ; 26.798,7.664 46.483,7.664 ; 26.798,7.76 46.483,7.76 ; 26.798,7.855 46.483,7.855 ; 26.798,7.95 46.483,7.95 ; 26.798,8.045 46.483,8.045 ; 26.798,8.14 46.483,8.14 ; 26.798,8.235 46.483,8.235 ; 26.798,8.33 46.483,8.33 ; 26.798,8.426 46.483,8.426 ; 3.86,3.668 23.545,3.668 23.545,8.521 3.86,8.521 3.86,3.668 ; 26.798,3.668 46.483,3.668 46.483,8.521 26.798,8.521 26.798,3.668